# Altium PCB My heater.PcbDoc (part 2 of 2)
Units mm, origin at the board's own origin, x right, y up, seen from the top; angles counter-clockwise.
Board outline 202.87 x 80.18 mm, 2 copper layers (Top Layer, Bottom Layer); 154 components, 161 nets, 495 pads, 412 vias.
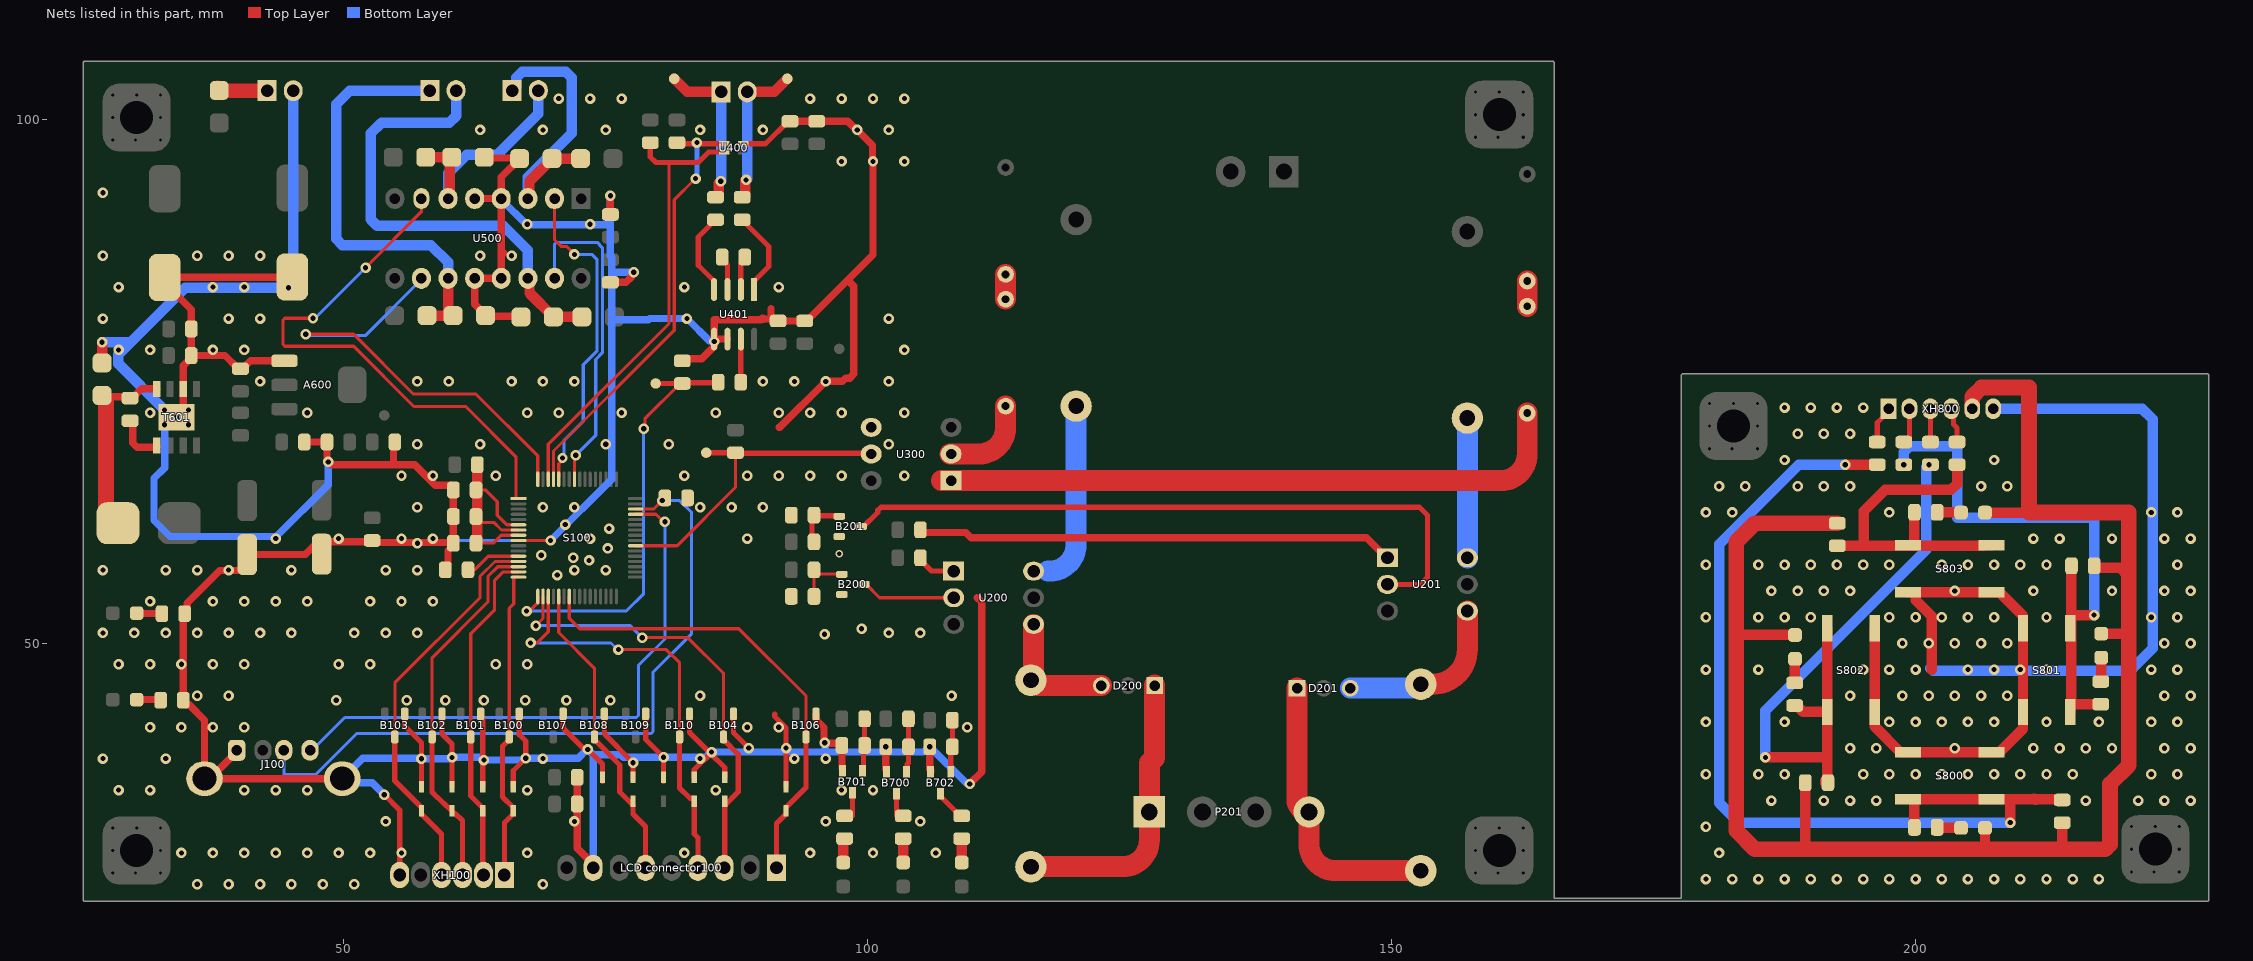
[diagram p2: the nets of this part, all layers, seen from the top]

## Via types
v1: diameter 1, hole 0.5, Top Layer to Bottom Layer, tented both sides, 410 vias
v2: diameter 0.7, hole 0.4, Top Layer to Bottom Layer, tented both sides, 2 vias

## Nets (pads, with @x,y where several pads share a name; then routed paths per layer and width w, separated by ;. In a path a pad name is that pad's centre, name@x,y a point inside that pad or via, vN(x,y) a via of type N, cw(c..) or ccw(c..) an arc to the next point about the centre after c; other vN are vias at no path point) (continued)
GND: "LCD connector100.8" A600.1 B100.1 B101.1 B102.1 B103.1 B104.1 B106.1 B107.1 B108.1 B109.1 B110.1 B200.2 B201.2 B700.2 B701.2 B702.2 C100.2 C101.2 C102.2 C103.2 C104.1 C105.1 C400.2 C401.2 C402.2 C403.2 C404.2 C500.2 C501.2 C601.2 C602.2 C603.2 C604.2 C605.2 C606.2 C607.2 C608.2 C609.2 C610.2 D100.2 D101.2 D102.2 D103.2 D104.2 D105.2 D106.2 D107.2 D108.2 D110.2 J100.1 J100.5 J100.6 R100.1 R207.1 R209.1 R601.1 R602.1 R603.1 R702.1 R705.1 R708.1 S100.9 S502.2 S503.2 S506.2 S507.2 S600.2 T601.6 T601.9 U300.4 U400.4 U401.5 U401.6 U500.4 U500.5 U500.12 U500.13 XH100.6 XH600.2 | length 590.4
  Top Layer w0.3: S100.9@66.668,59.817 v1(69.723,59.817)
  Top Layer w0.5: v1(53.848,35.56) 55.325,34.083 XH100.6@55.325,27.891 ; B103.1@55.814,43.264 55.814,42.103 57.404,40.513 v1(57.404,38.989) D100.2@57.404,36.322 ; B102.1@59.37,43.264 59.37,41.341 60.325,40.386 v1(60.325,39.116) D101.2@60.325,36.322 ; B101.1@63.053,43.264 63.053,43.014 63.246,42.821 D103.2@63.246,36.322 ; D102.2@66.167,36.322 66.167,37.846 v1(67.357,39.036) 67.357,40.664 66.736,41.285 B100.1@66.736,43.264 ; B107.1@70.927,43.264 70.927,41.923 72.876,39.974 73.183,39.974 v1(73.279,39.878) 74.676,38.481 D104.2@74.676,37.211 D104.2@74.676,36.83 ; B108.1@74.864,43.264 74.864,41.341 v1(77.597,38.608) D107.2@77.597,37.211 D107.2@77.597,36.957 ; B109.1@78.801,43.264 78.801,40.854 v1(80.518,39.137) D108.2@80.518,37.211 D108.2@80.518,36.83 ; B110.1@82.992,42.926 82.992,41.502 v1@84.994,39.5 ; D106.2@83.439,37.211 83.439,37.944 v1@84.994,39.5 ; D105.2@86.36,37.211 86.36,38.134 v1@84.994,39.5 ; B104.1@87.183,43.264 87.183,41.468 v1(88.646,40.005) v1@88.646,39.87 ; U400.4@88.113,97.688 90.249,97.688 92.383,99.822 C401.2@92.583,99.822 ; 91.12,43.264 91.12,43.014 92.202,41.932 v1(92.202,40.005) D110.2@92.202,36.322
  Top Layer w0.7: v1(34.036,71.583) 34.671,71.583 T601.6@34.671,74.295 34.671,76.508 35.433,77.27 C603.2@35.433,77.47 ; R601.1@34.671,53.032 R603.1@34.671,44.577 34.671,44.377 34.921,44.127 35.248,44.127 36.703,42.672 J100.5@36.703,37.084 ; R601.1@34.798,52.832 35.048,53.082 35.048,53.844 38.15,56.946 40.201,56.946 40.767,57.513 C607.2@40.767,58.477 46.313,58.477 47.526,59.69 52.705,59.69 52.768,59.627 60.389,59.627 C100.2@60.452,59.563 ; J100.1@39.773,39.794 39.773,39.653 37.204,37.084 J100.6@49.843,37.084 ; R602.1@40.132,76.2 39.932,76.2 38.662,77.47 C603.2@35.433,77.47 ; R602.1@40.332,76.2 41.094,76.962 A600.1@44.323,76.962 ; C601.2@45.085,84.963 45.06,84.938 32.917,84.938 C602.2@32.893,84.914 32.893,84.38 34.013,83.261 34.032,83.261 35.433,81.86 C604.2@35.433,80.01 C603.2@35.433,77.47 ; C610.2@46.228,69.215 C608.2@48.387,69.215 48.387,67.466 48.797,67.056 54.929,67.056 ; C609.2@54.737,69.215 54.737,67.248 54.929,67.056 ; C103.2@59.94,57.067 59.94,57.879 59.944,57.883 59.944,58.855 60.452,59.363 C100.2@60.452,59.563 ; U500.5@62.484,92.456 U500.4@65.024,92.456 ; S503.2@63.399,96.393 63.462,96.329 66.713,96.329 S502.2@66.776,96.266 65.024,94.514 U500.4@65.024,92.456 ; 65.278,87.249 65.024,86.995 ; S507.2@66.903,81.153 66.84,81.216 63.589,81.216 S506.2@63.526,81.28 63.526,81.334 62.484,82.376 U500.12@62.484,84.836 U500.13@65.024,84.836 65.024,86.995 ; C104.1@72.263,36.522 C105.1@72.263,34.671 72.263,30.449 73.787,28.925 73.787,28.575 ; C501.2@75.438,84.455 76.921,84.455 77.413,84.946 77.413,85.078 77.671,85.337 v1(77.671,85.418) ; C500.2@75.438,90.932 v1(75.438,92.71) ; C404.2@82.296,76.962 82.504,77.17 84.146,77.17 85.344,78.368 v1(85.344,78.81) U401.5@85.344,79.043 ; U401.6@86.614,79.043 U401.5@85.344,79.043 ; 90.015,81.015 89.934,81.015 89.818,80.899 85.344,80.899 U401.5@85.344,79.043 ; 90.084,80.946 90.096,80.958 C403.2@90.766,80.958 ; 90.766,81.961 C403.2@90.766,80.958 ; 91.567,70.612 91.612,70.612 95.902,74.902 95.957,74.902 96.055,75 97.589,75 97.9,75.311 98.269,75.311 98.679,75.721 98.679,84.074 98.08,84.673 ; C401.2@92.583,99.822 C400.2@95.123,99.822 98.097,99.822 98.861,99.057 99.057,99.057 99.098,99.098 99.098,98.902 100.45,97.55 100.45,96.089 100.361,96 100.5,95.861 100.5,87.092 98.08,84.673 ; B106.1@95.057,43.264 95.057,42.738 95.828,41.967 95.828,40.57 v1(95.885,40.513) 95.942,40.456 97.339,40.456 R705.1@97.536,40.259 97.536,38.088 97.592,38.032 B701.2@97.592,37.857 ; v1(101.727,40.132) 101.727,37.961 101.783,37.905 B700.2@101.783,37.73 ; v1(105.918,40.132) 105.918,37.984 105.997,37.905 B702.2@105.997,37.73 ; v1@109.743,36.591 110.871,37.719 110.871,53.946 110.461,54.356 ; 54.929,67.056 56.769,67.056 58.732,65.093 60.202,65.093 60.452,64.843 C102.2@60.452,64.643 C101.2@60.452,62.103 C100.2@60.452,59.563 ; 65.024,86.995 U500.4@65.024,92.456 ; C403.2@90.766,80.958 91.254,80.958 C403.2@91.44,80.772 C402.2@93.98,80.772 94.18,80.772 98.08,84.673
  Top Layer w1: S600.2@26.924,76.76 v1(26.924,78.74)
  Bottom Layer w0.3: v1(57.023,59.563) 57.277,59.817 v1(69.723,59.817)
  Bottom Layer w0.7: v1(32.893,70.866) 32.893,66.761 31.877,65.745 31.877,61.722 33.401,60.198 43.561,60.198 48.514,65.151 v1(48.514,67.31) ; v1(53.848,35.56) 52.724,36.684 50.243,36.684 J100.6@49.843,37.084 51.795,39.036 57.404,39.036 57.451,38.989 60.117,38.989 60.186,39.059 60.302,39.059 60.325,39.036 60.405,39.116 63.038,39.116 63.234,38.919 63.292,38.919 63.373,39.001 63.512,38.862 67.102,38.862 67.276,39.036 v1(67.357,39.036) 72.356,39.036 73.198,39.878 v1(73.279,39.878) 73.787,39.37 ; U500.4@65.024,92.456 65.024,92.356 67.44,89.94 67.443,89.943 67.77,89.943 67.772,89.94 73.359,89.94 73.361,89.943 73.497,89.943 73.5,89.94 73.503,89.943 73.77,89.943 73.772,89.94 75.438,89.94 ; v1(69.723,59.817) 75.565,65.659 75.565,80.899 ; 73.787,28.575 73.787,39.37 ; v1(75.438,92.71) 75.438,89.94 ; v1(77.671,85.418) 75.893,85.418 75.565,85.09 ; v1@82.747,80.899 82.75,80.902 82.845,80.902 84.88,78.867 85.287,78.867 v1(85.344,78.81) ; v1(82.747,81) 79.166,81 79.065,80.899 75.565,80.899 ; v1(95.885,40.513) 95.942,40.456 95.942,39.694 96.012,39.624 ; v1(109.728,36.576) 109.671,36.633 109.417,36.633 v1(105.918,40.132) 105.837,40.132 105.329,39.624 96.012,39.624 ; 73.787,39.37 76.408,39.37 76.641,39.137 80.417,39.137 80.518,39.036 80.619,39.137 84.522,39.137 85.009,39.624 v1(85.09,39.624) 96.012,39.624 ; 75.438,89.94 75.438,86.966 75.565,86.839 75.565,85.09 ; 75.565,80.899 75.565,85.09
  Bottom Layer w1: v1(26.924,78.74) 29.652,78.74 ; v1(35.179,70.866) 33.782,72.263 v1(32.893,72.263) 28.448,76.708 28.448,77.536 29.652,78.74 ; XH600.2@45.172,102.743 45.172,84.415 v1(44.704,83.947) 34.859,83.947 29.652,78.74
  other v1: 36,27 39,27 42,27 45,27 48,27 51,27 69,27 34.5,30 37.5,30 40.5,30 43.5,30 46.5,30 49.5,30 52.5,30 55.5,30 67.5,30 82.5,30 94.5,30 100.5,30 106.5,30 54,33 72,33 96,33 105,33 28.5,36 31.5,36 40.5,36 43.5,36 46.5,36 67.5,36 85.5,36 97.5,36 100.5,36 63.373,38.862 27,39 33,39 69,39 84,39 93,39 96,39 31.5,42 34.5,42 37.5,42 40.5,42 88.5,42 91.5,42 109.5,42 49.276,44.577 56.007,44.577 59.69,44.577 63.373,44.577 67.31,44.577 71.247,44.577 75.438,44.577 36,45 39,45 84,45 108,45 28.5,48 31.5,48 34.5,48 37.5,48 40.5,48 49.5,48 52.5,48 64.5,48 67.5,48 95.876,50.876 27,51 30,51 33,51 36,51 39,51 42,51 45,51 51,51 54,51 57,51 102,51 105,51 99.404,51.404 31.5,54 37.5,54 40.5,54 43.5,54 46.5,54 52.5,54 55.5,54 58.5,54 70.358,56.515 27,57 33,57 36,57 39,57 45,57 54,57 57,57 72,57 75,57 73.406,57.912 71.882,58.166 68.834,58.42 75.184,59.055 43.5,60 49.5,60 55.5,60 58.5,60 73.5,60 88.5,60 75.311,60.96 71.12,61.341 57,63 69,63 72,63 84,63 87,63 90,63 55.5,66 58.5,66 64.5,66 82.5,66 88.5,66 91.5,66 94.5,66 97.5,66 103.5,66 57,69 63,69 75,69 81,69 102,69 31.5,72 46.5,72 67.5,72 70.5,72 76.5,72 85.5,72 91.5,72 94.5,72 97.5,72 103.5,72 35.179,72.263 42,75 57,75 60,75 66,75 69,75 72,75 90,75 93,75 96,75 102,75 28.5,78 31.5,78 37.5,78 40.5,78 103.5,78 27,81 39,81 42,81 102,81 28.5,84 37.5,84 40.5,84 82.5,84 91.5,84 27,87 36,87 39,87 42,87 63,87 66,87 67.5,90 73.5,90 27,93 97.5,96 100.5,96 103.5,96 63,99 69,99 75,99 84,99 90,99 99,99 102,99 70.5,102 73.5,102 76.5,102 94.5,102 97.5,102 100.5,102 103.5,102
  other v2: 97.282,58.547
GND2: S800.2 S801.2 S802.2 S803.2 XH800.6 | length 116.6
  Top Layer w1: S802.2@196.088,51.435 S802.2@196.088,43.45 196.088,42.065 198.529,39.624 S800.2@199.279,39.624 S800.2@207.264,39.624 208.014,39.624 210.257,41.867 S801.2@210.257,43.45 S801.2@210.257,51.435 210.257,52.621 208.014,54.864 S803.2@207.264,54.864 S803.2@199.279,54.864 200.029,54.864 200.029,54.114 201.549,52.594 201.549,47.498
  Bottom Layer w1: 201.422,47.625 201.676,47.371 220.472,47.371 222.631,49.53 222.631,71.374 221.615,72.39 XH800.6@207.422,72.39
  other v1: 180,27.5 182.5,27.5 185,27.5 187.5,27.5 190,27.5 192.5,27.5 195,27.5 197.5,27.5 200,27.5 202.5,27.5 205,27.5 207.5,27.5 210,27.5 212.5,27.5 215,27.5 217.5,27.5 181.25,30 180,32.5 186.25,35 191.25,35 193.75,35 196.25,35 216.25,35 221.25,35 223.75,35 226.25,35 180,37.5 185,37.5 187.5,37.5 195,37.5 197.5,37.5 200,37.5 202.5,37.5 205,37.5 207.5,37.5 210,37.5 212.5,37.5 215,37.5 222.5,37.5 225,37.5 193.75,40 196.25,40 203.75,40 211.25,40 213.75,40 216.25,40 218.75,40 223.75,40 226.25,40 180,42.5 187.5,42.5 197.5,42.5 200,42.5 202.5,42.5 205,42.5 207.5,42.5 212.5,42.5 217.5,42.5 222.5,42.5 225,42.5 193.75,45 198.75,45 201.25,45 203.75,45 206.25,45 208.75,45 223.75,45 226.25,45 180,47.5 185,47.5 195,47.5 197.5,47.5 200,47.5 205,47.5 207.5,47.5 210,47.5 212.5,47.5 222.5,47.5 225,47.5 198.75,50 201.25,50 203.75,50 206.25,50 208.75,50 223.75,50 226.25,50 180,52.5 185,52.5 187.5,52.5 190,52.5 197.5,52.5 200,52.5 202.5,52.5 205,52.5 207.5,52.5 212.5,52.5 222.5,52.5 225,52.5 186.25,55 188.75,55 191.25,55 193.75,55 203.75,55 211.25,55 218.75,55 223.75,55 226.25,55 180,57.5 185,57.5 187.5,57.5 190,57.5 192.5,57.5 195,57.5 197.5,57.5 202.5,57.5 205,57.5 207.5,57.5 210,57.5 212.5,57.5 225,57.5 211.25,60 213.75,60 218.75,60 223.75,60 226.25,60 180,62.5 182.5,62.5 197.5,62.5 222.5,62.5 225,62.5 181.25,65 183.75,65 188.75,65 191.25,65 193.75,65 206.25,65 208.75,65 187.5,67.5 207.5,67.5 188.75,70 191.25,70 193.75,70 187.5,72.5 190,72.5 192.5,72.5 195,72.5
GND3: 
GND5: 
INPUT1: S100.60 U500.2 | length 31
  Top Layer w0.3: U500.2@70.104,92.456 70.104,88.519 70.736,87.887 71.244,87.887 v1(72.009,87.122) ; S100.60@70.509,65.913 70.509,67.145 70.866,67.502 v1(70.866,67.691)
  Bottom Layer w0.3: v1(70.866,67.691) 71,67.825 71,69.349 72.85,71.199 72.85,76.605 74.168,77.923 74.168,86.614 73.66,87.122 v1(72.009,87.122)
INPUT2: S100.1 U500.7 | length 52.2
  Top Layer w0.3: v1(47.053,81.026) 44.372,81.026 44.196,80.85 44.196,78.535 44.372,78.359 50.927,78.359 56.681,72.605 61.634,72.605 66.421,67.818 66.421,63.817 S100.1@66.668,63.817 ; v1(52.07,85.852) 57.4,91.182 57.4,92.452 U500.7@57.404,92.456
  Bottom Layer w0.3: v1@46.863,81.026 47.244,81.026 v1(52.07,85.852)
INPUT3: S100.64 U500.10 | length 42.8
  Top Layer w0.3: v1(46.355,79.502) 50.927,79.502 56.642,73.787 62.611,73.787 68.509,67.889 S100.64@68.509,65.658
  Bottom Layer w0.3: v1@46.101,79.375 52.043,79.375 57.404,84.736 U500.10@57.404,84.836
INPUT4: S100.57 U500.15 | length 31.3
  Top Layer w0.3: S100.57@72.009,65.658 72.009,67.818 v1(72.136,67.945)
  Bottom Layer w0.3: U500.15@70.104,84.836 70.104,88.089 70.28,88.265 74.168,88.265 74.676,87.757 74.676,77.724 74.041,77.089 74.041,69.85 v1(72.136,67.945)
MISO: "LCD connector100.1" B106.3 D110.1 S100.23 | length 45.3
  Top Layer w0.3: S100.23@71.509,54.476 71.509,52.388 72.501,51.396 87.699,51.396 94.107,44.988 B106.3@94.107,41.064
  Top Layer w0.5: 91.287,28.575 91.287,32.807 92.202,33.722 D110.1@92.202,34.022 92.202,34.322 94.107,36.227 B106.3@94.107,41.064
NetB200_1: B200.1 R206.2 R207.2 | length 5.4
  Top Layer w0.3: R207.2@94.869,54.483 R206.2@94.869,57.023 95.262,56.63 97.481,56.63 B200.1@97.525,56.586
NetB200_3: B200.3 U200.2 | length 9.1
  Top Layer w0.3: B200.3@99.625,55.626 99.85,55.626 101.12,54.356 U200.2@108.204,54.356
NetB201_1: B201.1 R208.2 R209.2 | length 5.1
  Top Layer w0.5: R208.2@94.742,59.69 94.678,59.753 94.678,62.166 94.686,62.174 97.226,62.174 B201.1@97.282,62.118
NetB201_3: B201.3 U201.2 | length 65.2
  Top Layer w0.5: B201.3@99.382,61.158 99.607,61.158 100.965,62.516 100.965,62.699 101.258,62.992 152.654,62.992 153.416,62.23 153.416,56.3 152.742,55.626 U201.2@149.606,55.626
NetB700_1: B700.1 R701.2 R702.2 | length 5.1
  Top Layer w0.5: B700.1@103.703,37.73 103.778,37.805 103.778,38.474 103.886,38.582 R702.2@103.886,40.132 R701.2@103.886,42.799
NetB700_3: B700.3 R700.1 | length 2.1
  Top Layer w0.5: R700.1@102.743,33.528 B700.3@102.743,35.63
NetB701_1: B701.1 R704.2 R705.2 | length 5
  Top Layer w0.5: B701.1@99.512,37.857 99.587,37.932 99.587,40.151 R705.2@99.695,40.259 R704.2@99.695,42.799
NetB701_3: B701.3 R703.1 | length 2.2
  Top Layer w0.5: R703.1@98.552,33.528 B701.3@98.552,35.757
NetB702_1: B702.1 R707.2 R708.2 | length 5
  Top Layer w0.5: B702.1@107.917,37.73 107.917,39.96 108.077,40.12 R707.2@108.077,42.672
NetB702_3: B702.3 R706.1 | length 3
  Top Layer w0.5: B702.3@106.957,35.63 106.957,35.405 108.447,33.915 108.447,33.874 108.793,33.528 R706.1@108.966,33.528
NetC100_1: C100.1 C101.1 C102.1 F100.1 S100.6 S100.7 S100.8 | length 22.6
  Top Layer w0.3: C100.1@62.611,59.563 64.262,59.563 65.016,60.317 S100.8@66.668,60.317 ; C101.1@62.611,62.103 62.611,61.984 63.05,61.546 64.311,61.546 65.04,60.817 S100.7@66.668,60.817 ; C102.1@62.611,64.643 63.5,64.643 64.643,63.5 64.643,62.23 65.556,61.317 S100.6@66.668,61.317
  Top Layer w1: C100.1@62.611,59.763 62.738,59.89 62.738,61.546 62.738,61.984 62.738,64.643 F100.1@62.738,67.056
NetC600_1: C600.1 I600.1 S600.1 T601.8 | length 18.3
  Top Layer w0.7: S600.1@26.924,73.66 27.051,73.533 29.464,73.533 C600.1@29.591,73.406 ; C600.1@29.791,73.406 30.68,74.295 T601.8@32.131,74.295
  Top Layer w1.5: S600.1@26.924,73.66 27.305,73.279 27.305,62.611 I600.1@28.448,61.468
NetC600_2: C600.2 T601.1 | length 4.9
  Top Layer w0.7: C600.2@29.591,71.247 29.595,71.247 29.845,70.997 29.845,69.117 30.255,68.707 32.131,68.707 T601.1@32.131,68.871
NetC900_1: 
NetC900_2: 
NetC901_1: 
NetD200_1: D200.1 P201.1 R202.1 | length 27.8
  Top Layer w2: R202.1@115.57,28.682 124.333,28.682 ccw(c124.333,31.222) 126.873,31.222 P201.1@126.873,33.909 126.873,38.564 127.381,39.072 D200.1@127.381,46.021
NetD200_3: D200.3 R202.2 U200.4 | length 11.5
  Top Layer w2: R202.2@115.57,46.482 115.761,46.673 115.761,47.38 115.824,47.443 U200.4@115.824,51.816 ; R202.2@116.205,45.974 D200.3@122.301,45.974
NetD201_1: D201.1 P201.4 R205.1 | length 27.6
  Top Layer w2: D201.1@140.97,45.72 140.97,35.052 ccw(c142.113,35.052) P201.4@142.113,33.909 142.113,30.841 ccw(c144.653,30.841) 144.653,28.301 R205.1@152.781,28.301
NetD201_3: D201.3 R205.2 U201.4 | length 17
  Top Layer w2: R205.2@152.781,46.101 153.924,46.101 ccw(c153.924,49.403) 157.226,49.403 U201.4@157.226,53.086
  Bottom Layer w2: D201.3@146.05,45.72 152.4,45.72 ccw(c152.4,46.101) R205.2@152.781,46.101
NetD600_2: D600.2 R601.2 | length 2.3
  Top Layer w0.7: D600.2@30.226,52.883 30.251,52.857 32.487,52.857 R601.2@32.512,52.832
NetD601_2: D601.2 R603.2 | length 2.3
  Top Layer w0.7: D601.2@30.249,44.64 R603.2@32.535,44.64
NetD700_2: D700.2 R700.2 | length 2.3
  Top Layer w1: D700.2@103.378,29.118 R700.2@103.378,31.404
NetD701_2: D701.2 R703.2 | length 2.5
  Top Layer w1: D701.2@97.663,28.974 97.663,31.269 97.763,31.369 R703.2@97.79,31.369
NetD702_2: D702.2 R706.2 | length 2.3
  Top Layer w1: D702.2@108.966,29.083 R706.2@108.966,31.369
NetD800_2: D800.2 R801.2 | length 2.3
  Top Layer w1: R801.2@202.057,32.436 202.082,32.41 204.318,32.41 D800.2@204.343,32.385
NetD801_2: D801.2 R803.2 | length 2.3
  Top Layer w1: R803.2@217.678,46.355 217.703,46.38 217.703,48.616 D801.2@217.729,48.641
NetD802_2: D802.2 R806.2 | length 2.3
  Top Layer w1: R806.2@188.468,46.228 188.481,46.241 188.481,48.501 D802.2@188.493,48.514
NetD803_2: D803.2 R811.2 | length 2.3
  Top Layer w1: R811.2@202.057,62.509 202.07,62.497 204.33,62.497 D803.2@204.343,62.484
NetD900_1: 
NetD900_2: 
NetD901_1: 
NetD901_2: 
NetD902_2: 
NetD903_1: 
NetD903_2: 
NetD1012_1: 
NetD1012_2: 
NetD1013_1: 
NetD1014_1: 
NetD1015_1: 
NetD1016_1: 
NetD1017_1: 
NetD1018_1: 
NetD1018_2: 
NetD1019_1: 
NetD1020_1: 
NetD1021_1: 
NetD1022_1: 
NetD1024_1: 
NetD1024_2: 
NetD1025_1: 
NetD1026_1: 
NetD1027_1: 
NetD1028_1: 
NetD1030_1: 
NetD1030_2: 
NetD1031_1: 
NetD1032_1: 
NetD1033_1: 
NetD1034_1: 
NetD1036_1: 
NetD1036_2: 
NetD1037_1: 
NetD1038_1: 
NetD1039_1: 
NetD1040_1: 
NetD1042_1: 
NetD1042_2: 
NetD1043_1: 
NetD1044_1: 
NetD1045_1: 
NetD1046_1: 
NetD1048_1: 
NetD1048_2: 
NetD1049_1: 
NetD1050_1: 
NetD1051_1: 
NetD1052_1: 
NetD1054_1: 
NetD1054_2: 
NetD1055_1: 
NetD1056_1: 
NetD1057_1: 
NetD1058_1: 
NetD1060_1: 
NetF1000_1: 
NetM900_3: 
NetQ1000_1: 
NetR200_1: R200.1 U200.1 | length 3.8
  Top Layer w0.5: R200.1@105.029,58.166 105.029,57.966 106.099,56.896 U200.1@108.204,56.896
NetR201_2: R201.2 U200.6 | length 17.3
  Bottom Layer w2: 117.221,56.896 117.348,56.896 ccw(c117.348,59.436) 119.888,59.436 R201.2@119.888,72.644
NetR203_1: R203.1 U201.1 | length 45.7
  Top Layer w0.7: R203.1@105.029,60.833 105.029,60.829 105.279,60.579 109.347,60.579 109.855,60.071 114.427,60.071 147.601,60.071 149.506,58.166 U201.1@149.606,58.166
NetR204_2: R204.2 U201.6 | length 13.3
  Bottom Layer w2: U201.6@157.226,58.166 R204.2@157.226,71.501
NetR301_2: R301.2 R302.1 | length 2.4
  Top Layer w2: R302.1@162.941,82.169 R301.2@162.941,84.582
NetR302_2: R302.2 U300.1 | length 61.2
  Top Layer w2: U300.1@107.041,65.532 160.401,65.532 ccw(c160.401,68.072) 162.941,68.072 R302.2@162.941,71.969
NetR303_2: R303.2 R304.1 | length 2.4
  Top Layer w2: R304.1@113.157,82.844 R303.2@113.157,85.217
NetR304_2: R304.2 U300.2 | length 8.8
  Top Layer w2: U300.2@107.86,68.072 110.617,68.072 ccw(c110.617,70.612) 113.157,70.612 R304.2@113.157,72.644
NetR402_1: R402.1 U401.7 | length 4.1
  Top Layer w0.5: R402.1@87.884,74.93 U401.7@87.884,79.043
NetR403_2: R403.2 U401.1 | length 8.4
  Top Layer w0.5: R403.2@88.011,90.424 88.184,90.424 88.53,90.078 88.53,89.905 90.551,87.884 90.551,85.961 89.154,84.564 U401.1@89.154,83.771
NetR404_1: R404.1 U401.3 | length 3.3
  Top Layer w0.5: R404.1@86.106,86.868 86.106,86.641 86.614,86.133 U401.3@86.614,83.771
NetR404_2: R404.2 U401.2 | length 3.3
  Top Layer w0.5: U401.2@87.884,83.771 87.884,86.26 88.265,86.641 R404.2@88.265,86.868
NetR405_2: R405.2 U401.4 | length 8.1
  Top Layer w0.5: U401.4@85.344,83.771 85.344,84.564 83.82,86.088 83.82,88.773 84.952,89.905 84.952,90.078 85.298,90.424 R405.2@85.471,90.424
NetR800_1: R800.1 R801.1 R802.1 S800.1 | length 90.7
  Top Layer w1: v1(193.294,67.056) R802.1@196.342,67.056 ; R801.1@199.898,32.436 199.898,35.124 S800.1@207.264,35.124 208.915,35.124 ; v1(209.042,32.893) 209.042,34.997 208.915,35.124 ; 211.328,35.152 211.428,35.052 211.455,35.052 ; R800.1@213.995,35.052 213.923,35.124 208.915,35.124
  Bottom Layer w1: v1(193.294,67.056) 188.849,67.056 181.262,59.469 181.262,34.765 183.134,32.893 v1(209.042,32.893)
NetR802_2: R802.2 XH800.1 | length 3.6
  Top Layer w0.5: R802.2@196.342,69.215 196.342,71.06 197.422,72.14 XH800.1@197.422,72.39
NetR803_1: R803.1 R804.1 R805.1 S801.1 | length 55.6
  Top Layer w1: R804.1@214.884,57.404 214.884,52.705 ; v1(217.043,52.705) 214.884,52.705 ; R803.1@217.678,44.196 214.757,44.196 S801.1@214.757,43.45 214.757,44.2 214.884,44.327 214.884,52.705
  Bottom Layer w1: v1(198.882,67.056) 198.882,68.248 199.468,68.834 203.962,68.834 203.962,61.976 217.043,61.976 v1(217.043,52.705)
NetR805_2: R805.2 XH800.2 | length 3.5
  Top Layer w0.5: R805.2@198.882,69.215 199.055,69.215 199.422,69.582 XH800.2@199.422,72.39
NetR806_1: R806.1 R807.1 R808.1 S802.1 | length 58.6
  Top Layer w1: v1(185.674,39.116) 191.461,39.116 191.588,39.243 ; R806.1@188.468,44.069 188.668,44.069 189.287,43.45 S802.1@191.588,43.45 ; R807.1@191.389,36.703 191.389,36.903 191.588,37.102 191.588,39.243 ; S802.1@191.588,51.435 S802.1@191.588,43.45 ; 191.588,39.243 S802.1@191.588,43.45
  Bottom Layer w1: v1(185.674,39.116) 185.674,43.561 201.041,58.928 201.041,66.802 v1(201.295,67.056)
NetR808_2: R808.2 XH800.3 | length 3.2
  Top Layer w0.5: R808.2@201.422,69.215 XH800.3@201.422,72.39
NetR809_1: R809.1 R810.1 R811.1 S803.1 | length 33.2
  Top Layer w1: R809.1@192.532,59.309 195.072,59.309 ; R811.1@199.898,62.509 199.898,59.563 S803.1@199.644,59.309 ; R810.1@203.962,67.056 203.962,65.229 203.376,64.643 197.104,64.643 195.072,62.611 195.072,59.309 ; S803.1@207.264,59.364 206.514,59.364 206.459,59.309 S803.1@199.644,59.309 ; 195.072,59.309 S803.1@199.644,59.309
NetR810_2: R810.2 XH800.4 | length 3.4
  Top Layer w0.5: XH800.4@203.422,72.39 203.613,72.199 203.613,70.914 203.962,70.565 R810.2@203.962,69.215
NetS500_2: S500.2 S503.1 U500.6 XH500.2 | length 22.2
  Top Layer w1: S500.2@57.811,96.393 S503.1@60.299,96.393 60.097,96.191 60.097,92.609 U500.6@59.944,92.456
  Bottom Layer w1: U500.6@59.944,92.456 59.944,94.869 61.712,96.637 64.633,96.637 68.56,100.564 XH500.2@68.56,102.76
NetS501_2: S501.2 S502.1 U500.3 XH500.1 | length 27.9
  Top Layer w1: U500.3@67.564,92.456 67.717,92.609 67.717,94.107 S502.1@69.876,96.266 S501.2@72.592,96.266
  Bottom Layer w1: XH500.1@66.06,102.76 66.46,103.16 66.46,103.974 67.046,104.56 71.169,104.56 71.755,103.974 71.755,98.679 67.564,94.488 U500.3@67.564,92.456
NetS504_2: S504.2 S507.1 U500.14 XH501.2 | length 45.8
  Top Layer w1: U500.14@67.564,84.836 67.717,84.683 67.717,83.439 S507.1@70.003,81.153 S504.2@72.719,81.153
  Bottom Layer w1: XH501.2@60.706,102.76 60.706,100.33 60.071,99.695 53.594,99.695 52.578,98.679 52.578,90.453 53.164,89.867 65.2,89.867 67.564,87.503 U500.14@67.564,84.836
NetS505_2: S505.2 S506.1 U500.11 XH501.1 | length 41.7
  Top Layer w1: S505.2@57.938,81.28 S506.1@60.426,81.28 59.944,81.762 U500.11@59.944,84.836
  Bottom Layer w1: XH501.1@58.206,102.76 50.563,102.76 49.276,101.473 49.276,88.597 49.862,88.011 58.293,88.011 59.944,86.36 U500.11@59.944,84.836
NetS605_2: S605.2 XH600.1 | length 4.8
  Top Layer w1.4: S605.2@37.973,103.023 38.253,102.743 XH600.1@42.672,102.743
NRST: C103.1 S100.12 | length 4.7
  Top Layer w0.3: 62.484,57.023 63.778,58.317 S100.12@66.668,58.317
RESET: "LCD connector100.6" B108.3 D107.1 S100.21 | length 29.1
  Top Layer w0.3: S100.21@70.509,54.476 70.509,51.03 73.914,47.625 B108.3@73.914,41.064
  Top Layer w0.5: B108.3@73.914,40.814 76.327,38.401 76.327,35.814 77.597,34.544 77.597,34.022 77.597,33.722 78.787,32.532 78.787,28.575
SCK: "LCD connector100.3" B104.3 D105.1 S100.18 | length 42.3
  Top Layer w0.3: v1(68.326,51.689) 69.009,52.372 S100.18@69.009,54.476 ; v1(78.486,50.546) 82.833,50.546 86.233,47.146 B104.3@86.233,41.064
  Top Layer w0.5: B104.3@86.233,40.814 87.63,39.417 87.63,35.814 86.36,34.544 86.36,28.648 86.287,28.575
  Bottom Layer w0.3: v1(68.326,51.689) 77.343,51.689 v1(78.486,50.546)
SCL: R400.1 S100.62 U400.2 | length 44.1
  Top Layer w0.3: S100.62@69.509,65.658 69.509,69.001 81.026,80.518 81.026,95.885
  Top Layer w0.5: R400.1@79.248,97.79 79.248,96.432 79.795,95.885 81.026,95.885 83.82,95.885 84.823,96.888 U400.2@86.309,96.888
SDA: R401.1 S100.61 U400.1 | length 42.1
  Top Layer w0.3: S100.61@70.009,65.658 70.009,68.358 81.526,79.875 81.526,92.321 v1(83.566,94.361)
  Top Layer w0.5: R401.1@81.963,97.688 U400.1@86.309,97.688
  Bottom Layer w0.5: v1(83.566,94.361) 83.693,94.488 v1(83.693,97.79)
SDI: "LCD connector100.4" B110.3 D106.1 S100.19 | length 41
  Top Layer w0.3: v1(67.818,50.038) 67.872,50.092 68.507,50.092 69.509,51.094 S100.19@69.509,54.476 ; v1(76.2,49.403) 80.772,49.403 82.042,48.133 B110.3@82.042,41.064
  Top Layer w0.5: B110.3@82.042,41.064 82.042,36.195 83.026,35.211 83.439,35.211 83.439,31.798 83.787,31.45 83.787,28.575
  Bottom Layer w0.3: v1(67.818,50.038) 75.492,50.038 76.127,49.403 v1(76.2,49.403)
"stm32 pwm in": 
SW1: B100.3 D102.1 S100.16 XH100.1 | length 30.1
  Top Layer w0.3: B100.3@65.786,41.064 65.786,53.34 66.218,53.772 66.218,56.317 S100.16@66.668,56.317
  Top Layer w0.5: XH100.1@65.325,27.891 65.325,32.88 66.167,33.722 D102.1@66.167,34.022 66.167,34.322 65.151,35.338 65.151,40.179 65.786,40.814 B100.3@65.786,41.064
SW2: B101.3 D103.1 S100.15 XH100.2 | length 32.2
  Top Layer w0.3: B101.3@62.103,41.064 62.103,50.927 64.389,53.213 64.389,56.007 65.199,56.817 S100.15@66.668,56.817
  Top Layer w0.5: B101.3@62.103,41.064 62.103,35.433 63.214,34.322 63.246,34.322 63.246,27.97 XH100.2@63.325,27.891
SW3: B102.3 D101.1 S100.14 XH100.3 | length 35.3
  Top Layer w0.3: B102.3@58.42,41.064 58.42,48.641 63.754,53.975 63.754,56.388 64.683,57.317 S100.14@66.668,57.317
  Top Layer w0.5: B102.3@58.42,41.064 58.42,35.789 58.566,35.642 58.574,35.635 D101.1@60.325,34.022 61.171,33.242 61.325,33.089 XH100.3@61.325,27.891
SW4: B103.3 D100.1 S100.13 XH100.4 | length 38
  Top Layer w0.3: B103.3@54.864,41.064 54.864,46.228 62.992,54.356 62.992,56.388 64.421,57.817 S100.13@66.668,57.817
  Top Layer w0.5: B103.3@54.864,41.064 54.864,36.862 57.404,34.322 D100.1@57.404,34.022 57.404,33.722 59.325,31.801 XH100.4@59.325,27.891
SWCLK: J100.3 R100.2 S100.46 | length 67.8
  Top Layer w0.3: S100.46@77.85,62.817 79.581,62.817 v1(80.391,63.627)
  Bottom Layer w0.3: J100.3@44.273,39.794 44.273,37.465 47.296,37.465 51.233,41.402 79.326,41.402 79.502,41.578 79.502,47.244 83.185,50.927 83.185,62.484 82.042,63.627 v1(80.391,63.627)
SWDIO: J100.4 S100.45 | length 55
  Top Layer w0.3: S100.45@77.85,62.317 79.796,62.317 v1@80.391,61.722
  Bottom Layer w0.3: J100.4@46.773,39.794 46.963,39.794 50.095,42.926 77.929,42.926 78.113,43.11 78.113,47.887 80.645,50.419 v1(80.645,61.595)
TC+: R403.1 T401.1 XH400.2 | length 14.7
  Top Layer w1: R403.1@88.011,92.583 88.211,92.583 88.311,92.683 88.311,94.153 v1(88.392,94.234) ; XH400.2@88.499,102.633 91.076,102.633 T401.1@92.329,103.886
  Bottom Layer w1: v1(88.392,94.234) 88.499,94.341 XH400.2@88.499,102.633
TC-: R405.1 T402.1 XH400.1 | length 15.4
  Top Layer w1: T402.1@81.534,103.886 82.787,102.633 XH400.1@85.999,102.633 ; R405.1@85.471,92.583 85.671,92.583 85.771,92.683 85.771,93.899 v1(85.979,94.107)
  Bottom Layer w1: v1(85.979,94.107) 85.999,94.127 XH400.1@85.999,102.633
Temp: C404.1 R402.2 S100.17 T400.1 | length 41.6
  Top Layer w0.3: v1(67.437,53.086) 67.571,53.22 67.853,53.22 68.509,53.876 S100.17@68.509,54.476 ; v1(78.613,70.485) 78.728,70.6 78.728,71.435 82.096,74.803 C404.1@82.296,74.803
  Top Layer w0.5: T400.1@79.756,74.803 C404.1@82.296,74.803 82.359,74.867 85.661,74.867 R402.2@85.725,74.93
  Bottom Layer w0.3: v1(67.437,53.086) 76.962,53.086 78.613,54.737 v1(78.613,70.485)
VCC: D800.1 D801.1 D802.1 D803.1 R800.2 R804.2 R807.2 R809.2 XH800.5 | length 161.4
  Top Layer w1: 182.88,50.673 183.007,50.8 D802.1@188.493,50.8 ; 189.484,30.304 R807.2@189.484,36.703 ; 206.629,30.353 D800.1@206.629,32.385 ; D803.1@206.629,62.484 210.82,62.484 ; 213.995,30.607 R800.2@213.995,32.893 ; R804.2@217.043,57.404 217.043,57.304 217.143,57.204 219.529,57.204 220.218,56.515 ; D801.1@217.729,50.927 219.632,50.927
  Top Layer w1.5: R809.2@192.532,61.468 184.658,61.468 182.88,59.69 182.88,50.673 182.88,32.131 184.658,30.353 206.629,30.353 218.108,30.353 218.567,30.812 218.567,36.576 220.345,38.354 220.345,62.484 210.82,62.484 210.82,74.411 206.301,74.411 205.422,73.532 XH800.5@205.422,72.39
"VCC IN": 
VIN: 
VOUT: 
"Zero Cross": R300.1 S100.39 T300.1 U300.5 | length 31.2
  Top Layer w0.3: S100.39@77.85,59.317 81.804,59.317 87.376,64.889 R300.1@87.376,68.199
  Top Layer w0.5: T300.1@84.455,67.945 84.59,67.945 84.844,68.199 R300.1@87.376,68.199 87.439,68.135 100.33,68.135 U300.5@100.33,68.072
pads on no net: S100.2 S100.3 S100.4 S100.5 S100.10 S100.11 S100.24 S100.25 S100.26 S100.27 S100.28 S100.29 S100.30 S100.31 S100.36 S100.37 S100.40 S100.41 S100.42 S100.43 S100.44 S100.47 S100.49 S100.50 S100.51 S100.52 S100.53 S100.54 S100.55 S100.56 S100.58 S100.59 S601.1 S602.1 S603.1 S604.1 S804.1 S805.1 T601.2 T601.3 T601.5 U200.3 U200.5 U201.3 U201.5 U300.3 U300.6

## Polygon pours and split planes (outlines as drawn)
GND2 on Top Layer "NONET_L-01_P-001" (solid, remove dead copper, pour order 0): 177.8,75.438 227.711,75.438 227.711,25.654 177.928,25.654
GND on Top Layer "NONET_L-01_P-001" (solid, remove dead copper, pour order 12): 25.4,105.283 104.521,105.283 104.521,61.976 111.379,61.976 111.379,25.654 25.4,25.654
GND on Top Layer "NONET_L-01_P-001" (solid, pour order 14): 104.061,105.029 108.331,105.029 108.331,72.517 103.505,72.517 103.505,85.852
NetD200_1 on Top Layer "NONET_L-01_P-001" (solid, pour order 9): 128.651,47.117 128.651,26.67 113.919,26.67 113.919,30.861 125.095,30.861 125.095,43.688 126.365,43.688 126.365,47.117
NetD201_1 on Top Layer "NONET_L-01_P-001" (solid, pour order 10): 139.954,46.99 139.954,26.543 154.686,26.543 154.686,30.734 143.51,30.734 143.51,43.561 142.24,43.561 142.24,46.99
+220V on Top Layer "NONET_L-01_P-001" (solid, pour order 5): 137.287,96.774 137.287,92.202 118.364,92.202 118.364,87.209 164.846,87.209 164.846,96.774
+5 on Top Layer "NONET_L-01_P-001" (solid, pour order 4): 54.102,60.833 37.973,60.833 35.941,58.801 31.496,58.801 31.496,66.294 54.102,66.294
+24 on Top Layer "NONET_L-01_P-001" (solid, pour order 2): 34.798,100.33 34.798,96.266 28.956,96.266 28.956,89.408 56.261,89.408 56.261,98.552 39.751,98.552 39.751,100.33
NetS605_2 on Top Layer "NONET_L-01_P-001" (solid, pour order 3): 34.798,104.267 43.815,104.267 43.815,101.219 34.798,101.219
GND on Bottom Layer "NONET_L-01_P-001" (solid, remove dead copper, pour order 15): 25.781,105.283 104.394,105.283 104.394,61.976 111.76,61.976 111.76,25.654 25.781,25.654
GND2 on Bottom Layer "NONET_L-01_P-001" (solid, remove dead copper, pour order 6): 177.863,75.438 227.774,75.438 227.774,25.654 177.991,25.654
GND on Bottom Layer "NONET_L-01_P-001" (solid, pour order 19): 103.904,105.029 108.18,105.029 108.18,72.707 103.354,72.707 103.354,86.042
AGND on Bottom Layer "NONET_L-01_P-001" (solid, pour order 13): 136.906,97.917 136.906,92.202 138.43,92.202 138.43,32.512 129.794,32.512 129.794,97.917
no net on Top Solder "NONET_L-01_P-001" (solid): 140.462,46.609 140.462,27.178 154.432,27.178 154.432,30.099 143.129,30.099 143.129,43.18 142.113,43.18 142.113,46.609
no net on Top Solder "NONET_L-01_P-001" (solid, pour order 11): 128.27,46.863 128.27,27.432 114.3,27.432 114.3,30.353 125.603,30.353 125.603,43.434 126.619,43.434 126.619,46.863
no net on Top Solder "NONET_L-01_P-001" (solid, pour order 8): 137.922,96.393 137.922,91.567 118.745,91.567 118.745,87.884 163.957,87.884 163.957,96.393
AGND on Bottom Solder "NONET_L-01_P-001" (solid, pour order 7): 136.652,97.028 136.652,91.059 137.922,91.059 137.922,32.893 130.556,32.893 130.556,97.028

## Keep-outs
Keep-Out Layer:
  lines w0.3: 165.354,25.527 177.8,25.527 ; 165.354,25.527 25.273,25.527 25.273,105.41 165.354,105.41 165.354,25.527 ; 177.8,25.527 227.838,25.527 227.838,75.565 177.8,75.565 177.8,25.527

## Silkscreen, mask and mechanical layers (free items; w line width, h text height)
Top Overlay:
  drawing of 90 lines, arcs and shapes, not listed
  text "Thermocouple" at 90.964,101.028 h1
  text "220VAC" at 116.074,99.905 h4
  text "-  Box Fan  +" at 56.832,97.727 h1
  text "-  Heater Fan  +" at 64.294,97.727 h1
  text "+24V   GND" at 40.038,96.647 h2
  text "- TC +" at 89.916,96.52 h1 r180
  text "+" at 36.211,90.463 h4
  text "+" at 23.892,90.336 h4
  text "+" at 41.037,61.38 h4
  text "+" at 34.052,61.253 h4
  text "Yo Bro WTF?  Put that Back!" at 69.048,56.488 h1 r45
  text "CH2" at 140.398,48.831 h4
  text "CH1" at 120.84,48.197 h4
  text "5V" at 26.661,48.088 h1 r90
  text "GND 3V3 CLK DIO" at 35.814,43.307 h1
  text "3V3" at 26.534,39.637 h1 r90
  text "IRON" at 119.448,37.846 h4.5
  text "Heater" at 136.085,37.695 h4.5
  text "3V3    GND   CS   RST   D/C   SDI   SCK   3V3   MISO" at 68.707,32.004 h1
  text "GND   3V3   SW4   SW3   SW2   SW1" at 52.578,30.734 h1
  text "CH2" at 99.871,30.679 h1
  text "ERR" at 105.487,30.546 h1
  text "CH1" at 93.968,30.361 h1
Bottom Overlay:
  text "D R  L  U  Vcc GND" at 195.199,70.676 h1 r180
Top Solder:
  drawing of 34 lines, arcs and shapes, not listed
Bottom Solder:
  drawing of 41 lines, arcs and shapes, not listed

## Text inside footprints (layer, text, board x,y; h text height)
R201: Top Overlay "1W" at 119.504,80.264 h1 r90; Top Overlay "2W" at 121.409,80.264 h1 r90
R202: Top Overlay "1W" at 115.954,38.862 h1 r270; Top Overlay "2W" at 114.049,38.862 h1 r270
R204: Top Overlay "1W" at 156.842,79.121 h1 r90; Top Overlay "2W" at 158.747,79.121 h1 r90
R205: Top Overlay "1W" at 153.165,38.481 h1 r270; Top Overlay "2W" at 151.26,38.481 h1 r270